# Altium PCB SOM_PCB_BLUETECHNIX.PcbDoc (part 7 of 8)
Units mil, origin at the board's own origin, x right, y up, seen from the top; angles counter-clockwise.
Board outline 1225 x 1620 mil, 8 copper layers (Top Layer, Int1 (Sign), Int2 (GND), Int3 (Sign), Int4 (Sign), Int5 (PWR), Int6 (Sign), Bottom Layer), stack 66.2 mil thick; 65 components, 201 nets, 938 pads, 497 vias.
Unrouted connection lines stored in the file: 25.
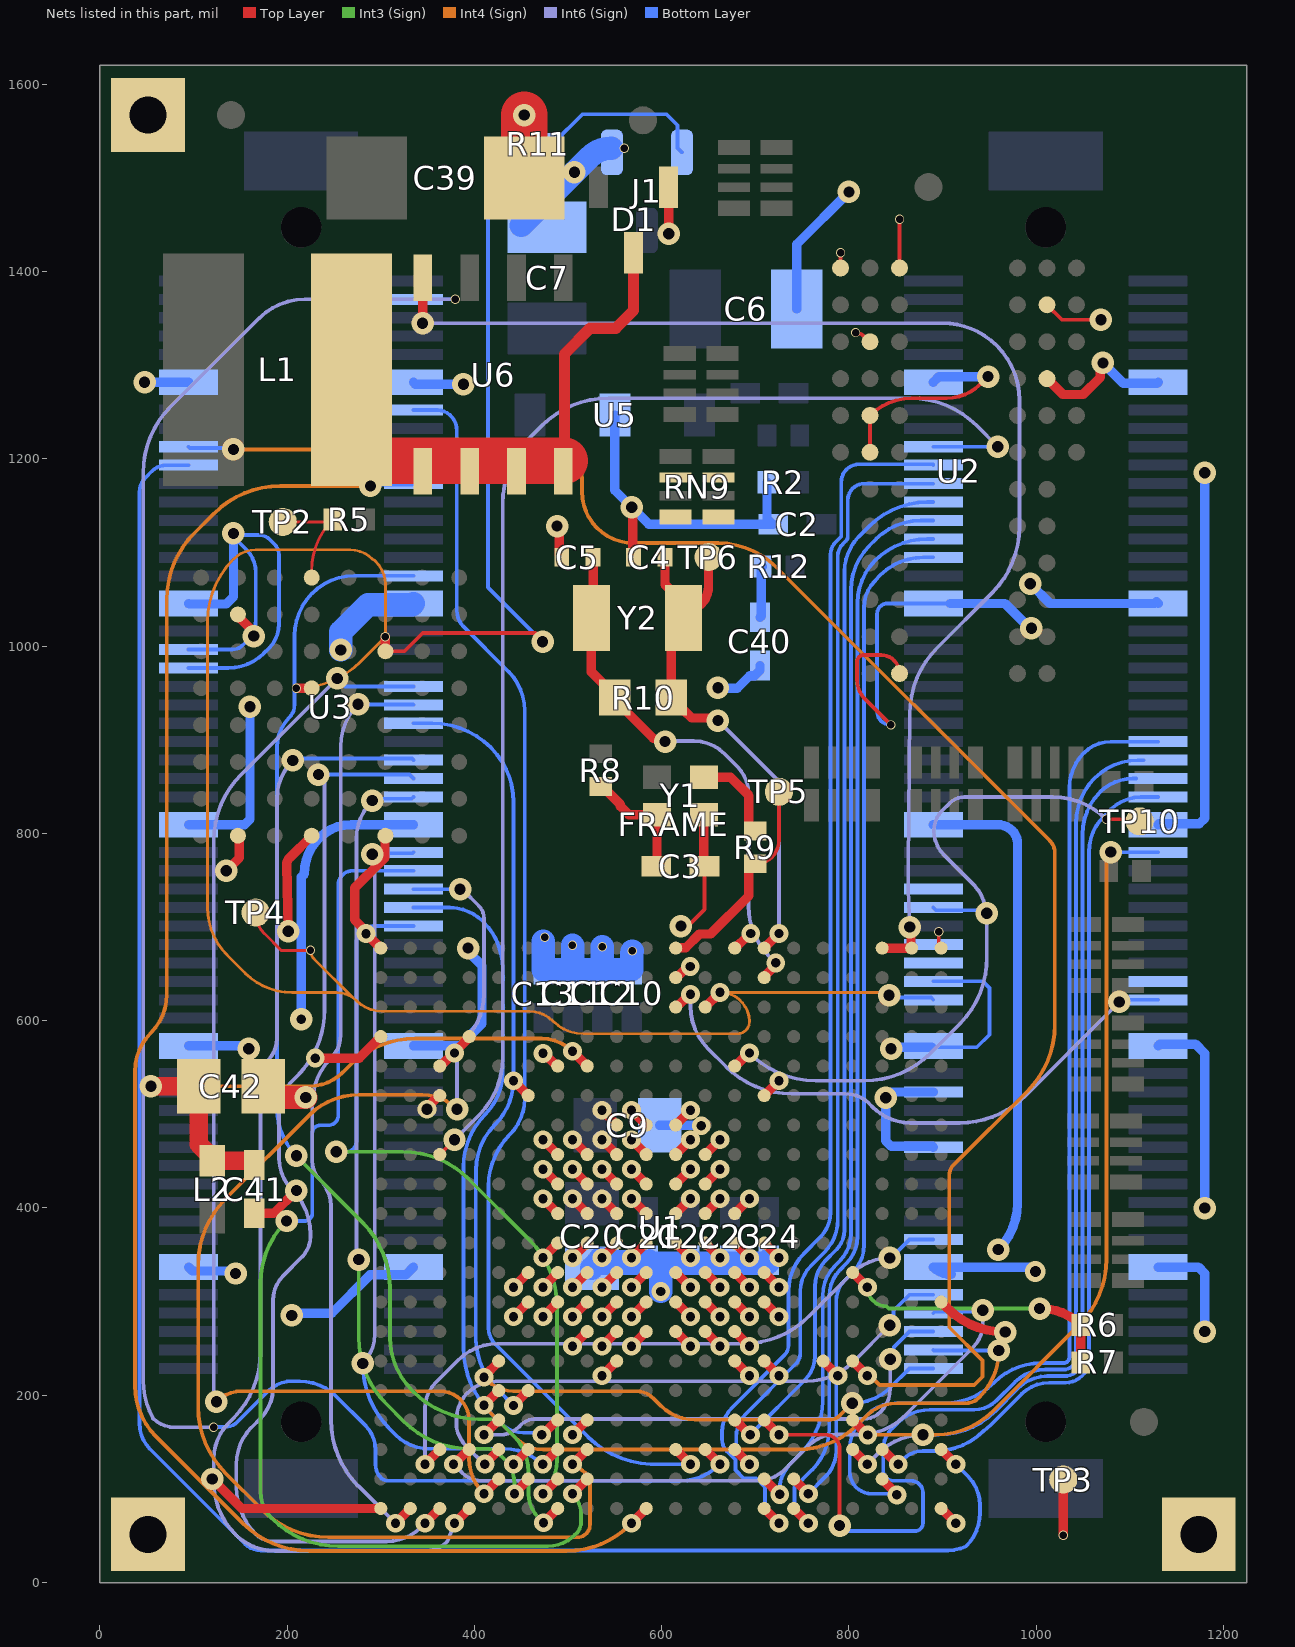
[diagram p12: the nets of this part, all layers, seen from the top]

## Via types
v1: diameter 20, hole 10, Top Layer to Int2 (GND), tented both sides, 68 vias
v2: diameter 10, hole 8, Top Layer to Int3 (Sign), tented both sides, 53 vias
v3: diameter 20, hole 10, Top Layer to Bottom Layer, tented both sides, 44 vias
v4: diameter 10, hole 8, Top Layer to Int1 (Sign), tented both sides, 41 vias
v5: diameter 20, hole 10, Top Layer to Int5 (PWR), tented both sides, 40 vias
v6: diameter 10, hole 8, Top Layer to Int4 (Sign), tented both sides, 33 vias
v7: diameter 20, hole 10, Top Layer to Int3 (Sign), tented both sides, 25 vias
v8: diameter 24, hole 12, Int6 (Sign) to Bottom Layer, tented both sides, 22 vias
v9: diameter 20, hole 10, Top Layer to Int4 (Sign), tented both sides, 19 vias
v10: diameter 24, hole 12, Int4 (Sign) to Bottom Layer, tented both sides, 17 vias
v11: diameter 24, hole 12, Int2 (GND) to Bottom Layer, tented both sides, 15 vias
v12: diameter 20, hole 10, Top Layer to Int1 (Sign), tented both sides, 13 vias
v13: diameter 24, hole 12, Top Layer to Int6 (Sign), tented both sides, 11 vias
v14: diameter 24, hole 12, Top Layer to Int4 (Sign), tented both sides, 10 vias
v15: diameter 24, hole 12, Top Layer to Int3 (Sign), tented both sides, 8 vias
v16: diameter 11, hole 8, Top Layer to Int1 (Sign), tented both sides, 8 vias
v17: diameter 10, hole 8, Top Layer to Bottom Layer, tented both sides, 7 vias
v18: diameter 20, hole 10, Top Layer to Int6 (Sign), tented both sides, 7 vias
v19: diameter 10, hole 8, Top Layer to Int6 (Sign), tented both sides, 6 vias
v20: diameter 10, hole 8, Int4 (Sign) to Bottom Layer, tented both sides, 6 vias
v21: diameter 24, hole 12, Int1 (Sign) to Bottom Layer, tented both sides, 5 vias
v22: diameter 24, hole 12, Top Layer to Int2 (GND), tented both sides, 5 vias
v23: diameter 10, hole 7, Top Layer to Int1 (Sign), tented both sides, 4 vias
v24: diameter 10, hole 8, Top Layer to Int2 (GND), tented both sides, 4 vias
v25: diameter 10, hole 8, Int2 (GND) to Bottom Layer, tented both sides, 4 vias
v26: diameter 24, hole 12, Int3 (Sign) to Bottom Layer, tented both sides, 4 vias
v27: diameter 24, hole 12, Top Layer to Bottom Layer, tented both sides, 4 vias
v28: diameter 10, hole 8, Int5 (PWR) to Bottom Layer, tented both sides, 3 vias
v29: diameter 20, hole 10, Int2 (GND) to Bottom Layer, tented both sides, 2 vias
v30: diameter 10, hole 8, Int6 (Sign) to Bottom Layer, tented both sides, 2 vias
v31: diameter 10, hole 8, Top Layer to Bottom Layer, 1 vias
v32: diameter 22, hole 12, Int2 (GND) to Bottom Layer, tented both sides, 1 vias
v33: diameter 24, hole 10, Int2 (GND) to Bottom Layer, tented both sides, 1 vias
v34: diameter 20, hole 12, Top Layer to Int5 (PWR), tented both sides, 1 vias
v35: diameter 20, hole 12, Top Layer to Int2 (GND), tented both sides, 1 vias
v36: diameter 24, hole 12, Top Layer to Int5 (PWR), tented both sides, 1 vias
v37: diameter 24, hole 12, Top Layer to Int1 (Sign), tented both sides, 1 vias

## Nets (pads, with @x,y where several pads share a name; then routed paths per layer and width w, separated by ;. In a path a pad name is that pad's centre, name@x,y a point inside that pad or via, vN(x,y) a via of type N, cw(c..) or ccw(c..) an arc to the next point about the centre after c; other vN are vias at no path point) (continued)
GND: C2.1 C3.1 C4.1 C5.1 C6.2 C7.2 C9.1 C10.1 C11.1 C12.1 C13.1 C20.1 C21.1 C22.1 C23.1 C24.1 C39.2 C40.1 C41.1 C42.1 D1.3 FRAME.61 FRAME.64 FRAME.68 FRAME.183 FRAME.184 FRAME.201 FRAME.202 FRAME.203 FRAME.204 FRAME.205 FRAME.206 FRAME.207 FRAME.208 FRAME.209 FRAME.210 FRAME.213 FRAME.214 FRAME.215 FRAME.216 FRAME.217 FRAME.218 FRAME.219 FRAME.220 FRAME.221 FRAME.222 FRAME.H5 FRAME.H6 J1.1 R2.1 TP3.0 U1.A1 U1.A13 U1.A20 U1.B11 U1.D1 U1.D4 U1.E3 U1.E7 U1.F3 U1.F6 U1.F14 U1.G9 U1.G10 U1.G11 U1.H7 U1.H8 U1.H9 U1.H10 U1.H11 U1.H12 U1.J7 U1.J8 U1.J9 U1.J10 U1.J11 U1.J12 U1.K7 U1.K8 U1.K9 U1.K10 U1.K11 U1.K12 U1.K13 U1.L7 U1.L8 U1.L9 U1.L10 U1.L11 U1.L12 U1.L13 U1.L14 U1.M6 U1.M7 U1.M8 U1.M9 U1.M10 U1.M11 U1.M12 U1.M13 U1.M14 U1.N6 U1.N7 U1.N8 U1.N9 U1.N10 U1.N11 U1.N12 U1.N13 U1.N14 U1.N20 U1.P8 U1.P9 U1.P10 U1.P11 U1.P12 U1.P13 U1.R9 U1.R13 U1.R14 U1.R16 U1.U8 U1.V6 U1.Y1 U1.Y20 U2.A1 U2.A3 U2.B8 U2.C2 U2.D8 U2.E2 U2.F2 U2.M3 U3.B2 U3.H2 U3.H4 U3.H6 U5.2 Y1.2 | length 8551.9
  Top Layer w4: v22(620.54,701.03) 622.59,698.98 625.9,698.98 645.76,718.85 C3.1@645.76,765 ; U2.A1@791.02,1403.74 v24(791.02,1420) ; v24(807.01,1334.84) cw(c807.01,1323.7) 814.87,1331.58 ; 814.88,1331.58 820.67,1325.79 823.3,1325.79 U2.C2@822.52,1325 ; U2.F2@822.52,1206.89 U2.E2@822.52,1246.26 cw(c867.12,1201.66) 867.12,1264.73 904.17,1264.73 ccw(c904.17,1316.09) 940.49,1279.78 v27(948.5,1287.79) ; v6(844.83,915.74) 817.15,943.42 cw(c838,964.26) 808.52,964.26 808.52,982.82 cw(c816.14,982.82) 816.14,990.44 834.25,990.44 cw(c834.25,970.67) U2.M3@854.02,970.67 ; U2.A3@854.02,1403.74 v24(854.02,1455.82) ; v24(895.85,694.93) 895.85,680.1 ccw(c898.46,680.1) U1.A20@898.46,677.48 ; U2.B8@1011.5,1364.37 1027.39,1348.48 v22(1069.07,1348.48)
  Top Layer w10: v15(120,110.55) 151.5,79.06 U1.Y1@300.04,79.06 ; v15(135,760) 148.82,773.82 148.82,796.22 U3.H2@147.52,797.52 ; U3.B2@147.52,1033.74 147.52,1031.85 162,1017.37 162,1013.12 v22(164.46,1010.66) ; C41.1@165,394.24 185.72,394.24 v15(210,418.51) ; v15(201.28,695.55) 199.59,766.47 cw(c209.59,766.71) 202.45,773.71 ; 202.48,773.74 U3.H4@226.26,797.52 ; v1(230,560) 277.05,560 U1.D1@300.04,582.99 ; U1.A1@300.04,677.48 299.86,677.48 284.38,692.96 284.38,695.49 272.13,707.74 272.13,741.62 304.52,774.02 304.52,797.04 U3.H6@305,797.52 ; v35(349.4,505.39) 349.4,507.29 362.11,520 U1.F3@363.03,520 ; U1.E3@363.03,551.5 363.9,551.5 377.91,565.5 v1(378.78,565.5) 378.78,566.37 394.53,582.12 U1.D4@394.53,582.99 ; v1(441.77,126.3) U1.V6@457.52,142.05 ; v1(441.77,283.78) U1.N6@457.52,299.53 ; v1(441.77,315.28) U1.M6@457.52,331.02 ; v1(441.77,535.75) U1.F6@457.52,520 ; v1(473.27,283.78) U1.N7@489.02,299.53 ; v1(473.27,315.28) U1.M7@489.02,331.02 ; v1(473.27,346.77) U1.L7@489.02,362.52 ; v1(473.27,409.76) U1.K7@489.02,394.02 ; v1(473.27,441.26) U1.J7@489.02,425.51 ; v1(473.27,472.76) U1.H7@489.02,457.01 ; v1(473.27,565) 474.43,565 487.93,551.5 U1.E7@489.02,551.5 ; v15(488.31,1128.19) 490.78,1125.73 490.78,1097.46 C5.1@493.24,1095 ; v1(504.76,157.8) U1.U8@520.51,173.54 ; v1(504.76,252.28) U1.P8@520.51,268.03 ; v1(504.76,283.78) U1.N8@520.51,299.53 ; v1(504.76,315.28) U1.M8@520.51,331.02 ; v1(504.76,346.77) U1.L8@520.51,362.52 ; v1(504.76,409.76) U1.K8@520.51,394.02 ; v1(504.76,441.26) U1.J8@520.51,425.51 ; v1(504.76,472.76) U1.H8@520.51,457.01 ; v1(536.26,220.79) U1.R9@552.01,236.54 ; v1(536.26,252.28) U1.P9@552.01,268.03 ; v1(536.26,283.78) U1.N9@552.01,299.53 ; v1(536.26,315.28) U1.M9@552.01,331.02 ; v1(536.26,346.77) U1.L9@552.01,362.52 ; v1(536.26,409.76) U1.K9@552.01,394.02 ; v1(536.26,441.26) U1.J9@552.01,425.51 ; v1(536.26,472.76) U1.H9@552.01,457.01 ; v1(536.26,504.25) U1.G9@552.01,488.5 ; v1(567.76,252.28) U1.P10@583.5,268.03 ; v1(567.76,283.78) U1.N10@583.5,299.53 ; v1(567.76,315.28) U1.M10@583.5,331.02 ; v1(567.76,346.77) U1.L10@583.5,362.52 ; v1(567.76,409.76) U1.K10@583.5,394.02 ; v1(567.76,441.26) U1.J10@583.5,425.51 ; v1(567.76,472.76) U1.H10@583.5,457.01 ; v1(567.76,504.25) U1.G10@583.5,488.5 ; v14(568,1148.17) 569,1147.17 569,1096 C4.1@570,1095 ; D1.3@607.4,1490 607.4,1440.3 v15(607.5,1440.2) ; U1.P11@615,268.03 v1(630.75,252.28) ; U1.N11@615,299.53 v1(630.75,283.78) ; U1.M11@615,331.02 v1@624.35,321.68 ; U1.L11@615,362.52 v1(630.75,346.77) ; U1.K11@615,394.02 v1(630.75,409.76) ; U1.J11@615,425.51 v1(630.75,441.26) ; U1.H11@615,457.01 v1(630.75,472.76) ; U1.G11@615,488.5 v1(630.75,504.25) ; U1.B11@615,645.98 616.08,645.98 625.18,655.09 v1(630.39,657.84) ; Y1.2@645,820 645,765.76 C3.1@645.76,765 ; U1.P12@646.5,268.03 v1(662.24,252.28) ; U1.N12@646.5,299.53 v1(662.24,283.78) ; U1.M12@646.5,331.02 v1@660.7,316.82 ; U1.L12@646.5,362.52 v1(662.24,346.77) ; U1.K12@646.5,394.02 v1(662.24,409.76) ; U1.J12@646.5,425.51 v1(662.24,441.26) ; U1.H12@646.5,457.01 v1(662.24,472.76) ; U1.R13@677.99,236.54 v1(693.74,220.79) ; U1.P13@677.99,268.03 v1(693.74,252.28) ; U1.N13@677.99,299.53 v1(693.74,283.78) ; U1.M13@677.99,331.02 v1(693.74,315.28) ; U1.L13@677.99,362.52 v1(693.74,346.77) ; U1.K13@677.99,394.02 v1(693.74,409.76) ; U1.A13@677.99,677.48 678.62,677.48 691.84,690.7 v1@691.84,696.28 ; U1.R14@709.49,236.54 v1(725.24,220.79) ; U1.N14@709.49,299.53 v1(725.24,283.78) ; U1.M14@709.49,331.02 v1(725.24,315.28) ; U1.L14@709.49,362.52 v1(725.24,346.77) ; U1.F14@709.49,520 v1(725.24,535.75) ; U1.R16@772.48,236.54 v1(788.23,220.79) ; U1.Y20@898.46,79.06 v3(914.21,63.31) ; U1.N20@898.46,299.53 904.77,293.23 ccw(c966.99,355.44) 904.92,293.07 ccw(c966.99,355.44) v22(966.99,267.45) ; U2.D8@1011.5,1285.63 1028.5,1268.63 1050.03,1268.63 1068.54,1287.14 1068.54,1299.71 v27(1071.22,1302.38) ; v31(1028.87,50.41) TP3.0@1028.87,109.93
  Top Layer w25: C42.1@174.41,530 174.41,528.68 185.14,517.95 v15(220,517.95)
  Top Layer w50: C39.2@453.23,1500 v22(453.23,1567)
  Bottom Layer w4: FRAME.183@94.84,976.61 137.13,976.61 ccw(c137.13,1030.81) 175.43,992.46 ; FRAME.184@94.84,996.3 141.52,996.3 ccw(c141.52,1012.16) 152.73,1000.94 157.38,1005.59 ccw(c134.95,1028.01) 166.66,1028.01 166.66,1078.67 ccw(c132.52,1078.67) 156.69,1102.79 ; 156.66,1102.82 142.74,1116.73 144.67,1118.66 169.4,1118.66 cw(c169.4,1101.14) 181.77,1113.54 ; 175.45,992.49 180.58,997.62 ; 180.6,997.63 ccw(c154.65,1023.55) 191.32,1023.55 191.32,1097.25 ccw(c175.05,1097.25) 186.57,1108.75 181.79,1113.53 ; v6(844.83,915.74) cw(c844.83,930.57) 830,930.57 830,1034.24 cw(c841.27,1034.24) 841.27,1045.51 FRAME.209@890.12,1045.51 FRAME.209@908,1045.51 ; FRAME.207@888.58,571.54 936.54,571.54 950,585 950,635 943.03,641.97 FRAME.68@890.12,641.97
  Bottom Layer w10: v11(47.87,1281.73) FRAME.218@94.84,1281.73 ; FRAME.222@94.84,336.85 99.01,332.68 142.32,332.68 v21(145,330) ; FRAME.221@94.84,573.07 156.1,573.07 v11(159.17,570) ; FRAME.220@94.84,809.29 154.5,809.29 160.36,815.15 v11(160.36,935.32) ; FRAME.219@94.84,1045.51 95.35,1045 135,1045 142.74,1052.74 v11@142.74,1116.73 ; v21(205,285.23) 205.59,285.23 208,287.64 247.62,287.64 288.5,328.52 326.67,328.52 FRAME.217@335,336.85 ; v33(215.15,601.47) 215.15,753.36 218.49,756.7 cw(c272.93,756.7) 234.44,795.2 cw(c268.47,761.16) 268.47,809.29 FRAME.215@335,809.29 ; FRAME.216@335,573.07 384.4,573.07 408.15,596.82 408.15,658.81 393.28,673.69 v11(393.28,677.48) ; FRAME.213@335,1281.73 337.03,1279.7 v21(388.28,1279.7) ; U5.2@550,1246.7 550,1166.34 586.34,1130 C2.1@718.32,1130 ; C9.1@597.71,488.2 641.8,488.2 v29(642.2,487.8) ; v21(660.11,955.45) 660.57,955 680.76,955 694.08,968.31 699.16,968.31 705,974.16 C40.1@705,979.24 ; R2.1@712.48,1175 712.48,1135.84 C2.1@718.32,1130 ; C2.1@719.24,1130 C2.1@718.32,1130 ; C6.2@744.13,1360 744.13,1429.13 v11(800,1485) ; v11@839.31,517.74 839.92,517.74 846.04,523.86 FRAME.64@890.12,523.86 ; v11(839.35,517.8) 839.31,516.79 839.31,471.57 845.16,465.71 889.21,465.71 FRAME.61@890.12,464.8 ; v11(845,570) 846.54,571.54 FRAME.207@888.58,571.54 ; FRAME.208@890.12,809.29 958.82,809.29 cw(c958.82,787.25) 974.41,802.83 cw(c960.91,789.34) 980,789.34 980,404.99 cw(c910.05,404.99) v11(959.51,355.53) ; FRAME.210@890.12,1281.73 896.17,1287.79 v27(948.5,1287.79) ; FRAME.209@908,1045.51 966.52,1045.51 v11@994.82,1017.21 ; FRAME.206@909.07,329 cw(c909.07,355.8) FRAME.206@890.12,336.85 990.34,336.85 cw(c990.34,332.19) v32@995,332.19 ; v11(993.68,1066.49) 1014.66,1045.51 1126.6,1045.51 1128.44,1047.35 FRAME.202@1130.28,1045.51 ; v32@995.02,332.17 v32(999.14,332.17) ; v27(1071.22,1302.38) 1093.11,1280.5 1129.04,1280.5 FRAME.201@1130.28,1281.73 ; FRAME.205@1130.28,336.85 1173.15,336.85 1180,330 v11(1180,267.95) ; FRAME.204@1130.28,573.07 1132.16,574.96 1170,574.96 1180,564.96 v11(1180,399.84) ; FRAME.203@1130.28,809.29 1131.13,810.15 1174.14,810.15 1180,816 v11(1180,1185)
  Bottom Layer w25: v11(257.26,995.83) 257.26,1015.09 286.4,1044.23 333.72,1044.23 FRAME.214@335,1045.51 ; C7.2@450,1449.13 v21(506.9,1506) ; v25@473.74,684.58 C13.1@473.74,654.37 567.12,654.37 ccw(c567.12,655.71) C10.1@568.06,654.76 568.06,669.68 cw(c593.07,669.68) v25(568.52,674.41) ; v25(504.76,680.48) 505.07,680.17 C11.1@505.07,654.76 ; v21(506.9,1506) 522.93,1522.04 cw(c546.34,1498.62) J1.1@546.34,1531.73 ; C20.1@525.46,335.59 530.69,340.81 603.66,340.81 ; C20.1@534.39,345.72 ccw(c542.58,353.97) 542.58,342.34 585.6,342.34 C21.1@585.6,343.43 ; C12.1@536.57,654.76 v25(536.57,679) ; v29(598.89,310.78) 598.89,327.48 cw(c619.9,327.48) 603.66,340.81 ; C24.1@714.44,344.24 714.44,342.47 712.78,340.81 603.66,340.81
  other v1: 630.75,315.28 662.24,315.28 284.2,692.96 695.11,693.01
  other v10: 568,1148.17
  other v11: 994.82,1019.11 142.74,1120.31
  other v17: 560.09,1531.73
  other v20: 844.83,915.74
  other v25: 475.02,688.87
JTAG_E\M\U\: FRAME.51 U1.R5 | length 536.9
  Top Layer w10: v9(410.28,219.34) 410.28,220.06 426.02,235.81 U1.R5@426.02,236.54
  Int4 (Sign) w4: v9(410.28,219.34) 413.63,215.99 ccw(c441.77,244.17) 441.77,204.34 572.65,204.34 cw(c572.65,178.1) 591.19,196.67 598.89,188.97 ccw(c635.55,225.63) 635.37,173.79 ccw(c635.55,225.63) 635.55,173.79 778.43,173.55 ccw(c778.43,190.51) 790.41,178.51 v10(803.44,191.5)
  Bottom Layer w4: v10(803.44,191.5) ccw(c803.4,249.56) 841.54,205.79 ccw(c803.4,249.56) 844.45,208.51 864.53,228.58 FRAME.51@890.12,228.58
JTAG_T\R\S\T\: FRAME.52 U1.T5 | length 781.6
  Top Layer w10: v9(410.28,189.29) U1.T5@426.02,205.04
  Int4 (Sign) w4: v9(410.28,189.29) 410.28,188.22 444.36,154.13 ccw(c473.83,183.59) 473.83,141.92 745.2,141.92 ccw(c745.2,232.32) 809.09,168.38 818.47,177.76 cw(c851.66,144.57) 851.66,191.5 924.68,191.5 ccw(c924.68,211.4) 938.75,197.33 939.37,197.95 ccw(c889.55,247.76) 944.8,204.05 ccw(c889.55,247.76) v10(960,247.76)
  Bottom Layer w4: FRAME.52@890.12,248.27 FRAME.52@890.37,248.01 ; v10@960,247.26 959.49,247.76 890.62,247.76 FRAME.52@890.37,248.01 ; v10(960,247.76) 959.75,248.01 FRAME.52@890.37,248.01
JTAG_TCK: FRAME.56 U1.V3 | length 697.9
  Top Layer w10: v3(347.28,126.3) U1.V3@363.03,142.05
  Int6 (Sign) w4: v3(347.28,126.3) 347.28,185.93 cw(c386,185.93) 358.62,213.31 383.18,237.86 cw(c424.55,196.49) 424.55,255 686.53,255 ccw(c686.53,355) 757.24,284.29 802.58,329.63 cw(c843.62,288.59) v8(843.62,346.63)
  Bottom Layer w4: v8(843.62,346.63) 844.78,346.63 864.53,366.38 FRAME.56@890.12,366.38
JTAG_TDI: FRAME.55 U1.V5 | length 655.5
  Top Layer w10: v18(411.25,126.44) 411.25,126.86 426.02,141.63 U1.V5@426.02,142.05
  Int6 (Sign) w4: 392.68,202.47 ccw(c421.37,173.82) 380.83,173.82 380.83,166.03 ccw(c420.75,173.18) 392.07,144.51 410.13,126.44 v18(411.25,126.44) ; 392.7,202.49 cw(c422.9,172.29) 422.9,215 754.6,215 ccw(c754.6,285.91) 804.74,235.77 v8(843.62,274.65)
  Bottom Layer w4: v8(843.62,274.65) 847.45,278.48 847.45,290.24 864.53,307.32 FRAME.55@890.12,307.32
JTAG_TDO: FRAME.54 U1.V4 | length 733.4
  Top Layer w10: v3(377.76,126.3) 378.27,126.3 394.02,142.05 U1.V4@394.53,142.05
  Int6 (Sign) w4: v3(377.76,126.3) 386.64,117.42 ccw(c408.06,138.85) 408.06,108.55 701.68,108.55 ccw(c701.68,150.89) 701.77,108.55 ccw(c701.68,150.89) 731.6,120.93 756.73,146.06 cw(c785.81,116.99) 785.81,158.11 812.65,158.11 ccw(c812.65,222.91) 858.48,177.09 932.69,251.3 ccw(c907.8,276.19) 943,276.19 v8(943,290.77)
  Bottom Layer w4: FRAME.54@890.12,287.64 891.68,289.2 941.44,289.2 v8(943,290.77)
JTAG_TMS: FRAME.53 U1.U5 | length 575.1
  Top Layer w10: v3(410.28,157.8) U1.U5@426.02,173.54
  Int6 (Sign) w4: v3(410.28,157.8) 427.35,157.8 ccw(c427.35,186.32) 447.49,166.13 449.9,168.53 cw(c464.32,154.11) 464.32,174.5 815.22,174.5 ccw(c815.22,200.47) 833.58,182.11 ccw(c808.06,207.63) 844.15,207.63 v8(844.15,238.43)
  Bottom Layer w4: v8(844.15,238.43) 847.97,242.25 847.97,251.4 864.53,267.95 FRAME.53@890.12,267.95
N\M\I\: FRAME.34 U1.C11 | length 639.7
  Top Layer w10: U1.C11@615,614.49 616.08,614.49 629.59,628 v3(630.75,628)
  Int6 (Sign) w4: v3(630.75,628) 630.75,615.5 ccw(c695.1,615.5) 649.6,570 668.37,551.23 ccw(c739.08,621.94) 739.08,521.94 796.08,521.94 cw(c796.08,485.76) 821.67,511.34 825.63,507.38 ccw(c865.6,547.35) 833.61,500.74 ccw(c865.6,547.35) 865.6,490.82 918.05,490.82 ccw(c918.05,590.82) 961.47,500.74 ccw(c918.05,590.82) 988.76,520.11 v8(1088.64,620)
  Bottom Layer w4: v8(1088.64,620) 1090.93,622.28 FRAME.34@1130.28,622.28
NetC3_2: C3.2 R8.2 Y1.1 | length 128.7
  Top Layer w10: R8.2@535,849.96 536.77,849.96 555.95,830.78 555.95,829.05 565,820 Y1.1@595,820 595,765.76 C3.2@594.24,765
NetC4_2: C4.2 R10.1 TP6.0 U1.A14 Y2.1 | length 574.8
  Top Layer w10: C4.2@603.53,1095 603.53,1065.65 623.43,1045.75 Y2.1@623.43,1037.17 ; TP6.0@650,1095 650,1063.74 cw(c623.43,1063.74) Y2.1@623.43,1037.17 ; v13(660.11,920.48) 657.43,923.16 632.08,923.16 624.53,930.71 622.17,930.71 610.24,942.64 R10.1@610.24,945 610.24,1016.81 Y2.1@623.43,1030 Y2.1@623.43,1037.17 ; U1.A14@709.49,677.48 709.6,677.48 725.12,693 v18(725.24,693)
  Int6 (Sign) w4: v13(660.11,920.48) 725.24,855.35 v18(725.24,693)
NetC5_2: C5.2 R10.2 U1.B14 Y2.2 | length 550.6
  Top Layer w10: C5.2@526.76,1095 526.76,1031.76 Y2.2@525,1030 525,972.36 550,947.36 R10.2@550,945 550,942.64 591.07,901.57 ; U1.B14@709.49,645.98 709.49,647.07 721.73,659.31 v18(721.73,661.67)
  Int6 (Sign) w4: v13(603.61,898) 604.21,898.61 634.35,898.61 cw(c634.35,852.15) 667.2,885 680.47,871.73 ; 680.49,871.71 cw(c650.87,842.13) 692.73,842.13 692.73,722.77 ccw(c770.23,722.77) 715.43,667.97 v18(721.73,661.67)
NetC40_2: C40.2 R12.1 | length 55.3
  Bottom Layer w10: C40.2@705,1030.76 706.24,1032 706.24,1083.76 R12.1@707.48,1085
NetC41_2: C41.2 C42.2 L2.2 U1.E8 | length 676.5
  Top Layer w10: v9(504.76,567.24) U1.E8@520.51,551.5
  Top Layer w20: v14(54.59,530) C42.2@105.59,530 105.59,467.87 120,453.46 L2.2@120,450.51 164.16,450.51 165,449.67 C41.2@165,445.76
  Int4 (Sign) w4: v14(54.59,530) 223.54,530 ccw(c223.54,581.21) 259.74,544.99 266.46,551.71 cw(c337.17,481) 337.17,581 471.55,581 cw(c471.55,534.03) v9@504.74,567.26
NetD1_1: D1.1 L1.1 U6.5 U6.6 U6.7 U6.8 | length 594.2
  Top Layer w12: U6.8@495,1186.75 496.13,1187.88 496.13,1197.83 496.16,1311.97 523.72,1339.52 551.18,1339.52 570,1358.34 D1.1@570,1420
  Top Layer w50: L1.1@268.74,1295 268.74,1216.14 287.05,1197.83 345,1197.83 395,1197.83 445,1197.83 U6.8@496.13,1197.83
NetJ1_2: J1.2 R11.1 | length 182.1
  Bottom Layer w4: R11.1@485.04,1535.89 485.04,1537.66 515.37,1567.99 605.16,1567.99 616.99,1556.16 616.99,1531.95 J1.2@621.7,1527.23
NetR5_1: R5.1 TP2.0 U3.A4 | length 122.2
  Top Layer w3: TP2.0@195.39,1132.64 246.38,1132.64 R5.1@248.74,1135 ; U3.A4@226.26,1073.11 226.26,1080.73 cw(c303.01,1080.73) R5.1@248.74,1135 ; R5.1@248.74,1135 R5.1@248.74,1135
NetR6_1: R6.1 R7.1 U1.M17 | length 307.3
  Top Layer w10: U1.M17@803.98,331.02 v3(819.72,315.28) ; v15(1003.6,292.53) 1005.17,292.53 cw(c1005.17,232.68) R6.1@1047.48,275 R7.1@1047.48,235
  Int3 (Sign) w4: v3(819.72,315.28) ccw(c840,315.28) 840,295 842.47,292.53 v15(1003.6,292.53)
NetR9_1: R9.1 Y1.3 | length 98
  Top Layer w10: Y1.3@645,860 673.49,860 693.19,840.3 693.19,807.56 698.23,802.52 R9.1@700,802.52
NetR9_2: R9.2 TP5.0 U1.A11 | length 230.6
  Top Layer w4: R9.2@700,767.48 ccw(c700,792.72) 725.24,792.72 TP5.0@725.24,844.43
  Top Layer w10: U1.A11@615,677.48 615.41,677.9 625.7,677.9 640.28,692.48 652.24,692.48 693.19,733.43 693.19,762.44 698.23,767.48 R9.2@700,767.48
NetRN9_2: RN9.2
NetRN9_4: RN9.4
NetRN9_5: RN9.5
NetRN9_7: RN9.7
NetU1_A18: U1.A18 U1.A19 U6.4 | length 1389.8
  Top Layer w10: v13(344.65,1344.72) 344.82,1344.9 344.82,1393.07 U6.4@345,1393.25 ; U1.A18@835.47,677.48 865,677.48 U1.A19@866.31,677.48 ; v13(864.83,699.87) 866.2,698.5 866.2,678.25 U1.A19@866.97,677.48
  Int6 (Sign) w4: v13(344.65,1344.72) 900.42,1344.72 cw(c900.42,1263.54) 922.79,1341.58 cw(c900.42,1263.54) 957.8,1320.97 cw(c899.26,1262.39) 982.08,1262.39 982.08,1127.34 cw(c882.08,1127.34) 952.79,1056.63 894.29,998.13 ccw(c965,927.42) 865,927.42 863.3,765.15 863.3,765 863.3,740.73 ccw(c892.42,740.73) 863.32,739.62 v13(864.83,699.87)
NetU4_33: FRAME.33
NetU4_69: FRAME.69
NetU4_70: FRAME.70
NetU4_73: FRAME.73
PB2: FRAME.121 U1.T6 | length 845
  Top Layer w10: v3(441.77,189.1) 441.77,189.2 457.52,204.94 U1.T6@457.52,205.04
  Bottom Layer w4: FRAME.121@335,917.56 354.77,917.56 cw(c354.77,828.5) 417.74,891.47 cw(c359.72,833.45) 441.77,833.45 441.77,543.54 441.77,536.79 cw(c374.28,536.79) 434.35,506.02 cw(c374.28,536.79) 422,489.07 ccw(c471.12,439.95) 401.66,439.95 401.66,423.09 ccw(c538.95,416.88) 401.52,416.88 ; 401.52,416.84 401.52,259.81 ccw(c480.28,262.02) 424.56,206.31 v3(441.77,189.1)
RESET: FRAME.67 R11.2 TP4.0 U1.C12 U3.C6 U3.D4 | length 2623.1
  Top Layer w3: TP4.0@166.46,715.43 ccw(c198.05,715.43) 175.71,693.09 193.8,675 v6(225,675)
  Top Layer w4: U3.C6@305,994.37 325.28,994.37 344.91,1014 463.27,1014 cw(c463.27,1004.5) v14(472.77,1004.5)
  Top Layer w10: v6(210,955) U3.D4@226.26,955 ; U3.C6@305,994.37 v6(305,1010) ; U1.C12@646.5,614.49 v9(662.24,630.16)
  Int4 (Sign) w3: v6(210,955) ccw(c210,1051.57) 278.28,983.28 v6(305,1010) 305,1065.86 ccw(c270.86,1065.86) 295,1090 ccw(c282.93,1077.93) 291.29,1092.81 ccw(c267.14,1068.67) 267.14,1102.82 166.89,1102.82 ccw(c166.89,1068.67) 142.74,1092.82 ccw(c209.72,1025.84) 115,1025.84 115,720.7 ccw(c186.7,720.7) 136,670 155.23,650.77 ccw(c205.38,700.92) 205.38,630 253.09,630 cw(c253.09,600.44) 270.17,624.57 ; v6(225,675) ccw(c237.7,675) 228.72,666.02 270.17,624.57 ; v9(662.24,630.16) 835.51,630.16 cw(c835.51,619.71) v10(842.9,627.1) ; v9@663.05,630.15 cw(c662.45,598.87) 693.73,599.47 cw(c662.45,598.87) 693.74,598.87 cw(c680.87,598.87) 680.87,586 516.41,586 cw(c516.41,631.66) 484.13,599.37 ccw(c458.47,573.72) 458.47,610 301.38,610 cw(c301.38,648.72) 274,621.34 ccw(c253.09,600.44) 270.17,624.57
  Bottom Layer w4: 422.38,1524.86 ccw(c441.24,1506) 414.57,1506 414.57,1062.7 v14(472.77,1004.5) ; 422.46,1524.94 cw(c448.97,1498.31) 440.86,1535 cw(c448.97,1498.31) 448.97,1535.89 R11.2@450,1535.89 ; v10(842.9,627.1) 845.31,624.69 887.71,624.69 FRAME.67@890.12,622.28
  other v10: 472.77,1004.5
RSCLK0: FRAME.93 U1.H3 | length 1396.3
  Top Layer w4: U1.H3@363.03,457.01 v13(378.78,472.76)
  Int6 (Sign) w4: v13(378.78,472.76) 404.49,498.47 ; 404.52,498.5 ccw(c342.42,560.54) 430.2,560.54 430.2,1151.98 cw(c530.2,1151.98) 459.49,1222.69 472.24,1235.44 cw(c542.96,1164.73) 542.96,1264.73 865.68,1264.73 cw(c865.68,1164.73) 936.39,1235.44 v8(959,1212.83)
  Bottom Layer w4: FRAME.93@890.12,1212.83 v8(959,1212.83)
SCL1: FRAME.119 U1.W5 | length 1304.4
  Top Layer w10: v9(410.28,94.8) U1.W5@426.02,110.55
  Int4 (Sign) w4: v10(124.54,193.15) cw(c151.56,166.13) 151.56,204.34 363.28,204.34 cw(c363.28,173.35) 394.27,173.35 394.27,132.82 ccw(c448.04,132.82) v9@409.99,94.83 ; v9@410.02,94.8 v9(410.28,94.8)
  Int6 (Sign) w4: v10@126.34,193.15 cw(c137.41,204.22) 121.76,204.22 121.76,792.11 cw(c221.76,792.11) 151.05,862.82 v8(253.66,965.43)
  Bottom Layer w4: v8(253.66,965.43) 262.17,956.93 FRAME.119@335,956.93
SD_CLK: FRAME.88 U1.Y15 | length 1151.6
  Top Layer w10: U1.Y15@740.98,79.06 v3(756.73,63.31)
  Bottom Layer w4: v3(756.73,63.31) 741.73,78.31 741.73,101.4 760.36,120.03 ccw(c715.38,165.01) 778.99,165.01 778.99,306.04 cw(c818.34,306.04) 790.52,333.86 796.98,340.32 ; 797,340.34 ccw(c767.61,369.68) 809.14,369.68 809.14,1046.1 cw(c873.13,1046.1) 827.86,1091.33 cw(c883.55,1035.69) FRAME.88@883.55,1114.41 ; FRAME.88@883.59,1114.41 FRAME.88@890.12,1114.41
SD_CMD: FRAME.87 U1.W15 | length 1090.1
  Top Layer w10: U1.W15@740.98,110.55 v3(756.73,94.8)
  Bottom Layer w4: v3(756.73,94.8) 775.09,113.17 ccw(c747.71,140.55) 786.44,140.55 786.44,301.08 cw(c816.38,301.08) 795.18,322.23 803.98,331.02 ; 804,331.04 ccw(c774.61,360.39) 816.14,360.39 816.14,1041.37 cw(c856.32,1041.37) 827.6,1069.47 827.74,1069.62 cw(c879.71,1028.39) FRAME.87@879.71,1094.72 ; FRAME.87@879.75,1094.72 FRAME.87@890.12,1094.72
SD_D0: FRAME.92 U1.Y14 | length 1321.6
  Top Layer w10: U1.Y14@709.49,79.06 v3(725.24,63.31)
  Bottom Layer w4: 675.47,187.25 ccw(c701.99,160.77) 664.51,160.77 664.51,153.01 ccw(c683.25,153.01) 670,139.76 678.74,131.02 678.74,120.09 687.53,111.3 700.92,111.3 710.24,101.98 710.24,78.31 v3(725.24,63.31) ; 675.49,187.27 731.2,242.98 ccw(c720.89,253.28) 735.46,253.28 735.46,310.96 cw(c793.38,310.96) 752.43,351.91 769.39,368.88 ccw(c742.92,395.35) 780.35,395.35 780.35,1097.74 cw(c799.7,1097.74) 786.01,1111.41 791.69,1117.09 791.69,1174.95 cw(c810.87,1174.95) 810.87,1194.13 889.13,1194.13 cw(c889.13,1193.15) FRAME.92@890.12,1193.15
SD_D1: FRAME.91 U1.V13 | length 1201.3
  Top Layer w10: U1.V13@677.99,142.05 v3(693.74,126.3)
  Bottom Layer w4: v3(693.74,126.3) 679.61,140.43 679.61,155.13 cw(c715.09,155.13) 690,180.22 743.29,233.51 ; 743.3,233.53 ccw(c731.99,244.8) 747.96,244.8 747.96,310.78 cw(c786.36,310.78) 759.21,337.94 773.46,352.19 ccw(c738.03,387.62) 788.14,387.62 788.14,1096.18 cw(c806.14,1096.18) 793.41,1108.91 796.63,1112.14 ccw(c791.69,1117.09) 798.69,1117.09 798.69,1155.7 cw(c816.45,1155.7) 816.45,1173.46 FRAME.91@890.12,1173.46
SD_D2: FRAME.90 U1.U13 | length 1114.4
  Top Layer w10: U1.U13@677.99,173.54 678.43,173.54 692.46,159.51 v3(694.78,157.77)
  Bottom Layer w4: v3(694.78,157.77) 695.47,158.66 753.29,216.47 ccw(c728.1,241.67) 763.72,241.67 763.72,316.48 cw(c802.52,316.48) 775.08,343.91 786.45,355.27 ; 786.46,355.29 ccw(c765.47,376.26) 795.14,376.26 795.14,1079.14 cw(c848.83,1079.14) 810.85,1117.09 822,1128.24 cw(c883.66,1066.58) 883.66,1153.78 FRAME.90@890.12,1153.78
SD_D3: FRAME.89 U1.W14 | length 1140.9
  Top Layer w10: U1.W14@709.49,110.55 v3(725.96,94.08)
  Bottom Layer w4: v3(725.96,94.08) 725.96,99.02 cw(c765.25,99.02) 737.47,126.8 748.98,138.31 ; 749,138.33 ccw(c693.41,193.88) 771.99,193.88 771.99,306.04 cw(c818.34,306.04) 785.51,338.76 cw(c818.34,306.04) 785.6,338.84 789.8,343.04 ccw(c760.01,372.83) 802.14,372.83 802.14,1059.8 cw(c869.1,1059.8) 821.75,1107.15 828.75,1114.15 ; 828.79,1114.18 cw(c876.91,1065.99) 876.91,1134.09 FRAME.89@890.12,1134.09
SDA1: FRAME.120 U1.Y2 | length 998.8
  Top Layer w10: v3(315.79,63.31) U1.Y2@331.54,79.06
  Int6 (Sign) w4: v8(275.82,937.78) ccw(c320.7,892.9) 257.23,892.9 257.23,584.98 cw(c221.9,584.98) 246.88,560 ccw(c294.89,512) 227,512 227,450.12 ccw(c255.89,450.12) 235.44,429.72 cw(c207.88,402.12) 238.46,426.32 cw(c207.88,402.12) 246.88,402.12 246.88,173.63 ccw(c346.88,173.63) 275.94,103.15 ccw(c346.88,173.63) 276.17,102.92 v3(315.79,63.31)
  Bottom Layer w4: v8(275.82,937.78) 276.09,937.51 334.73,937.51 FRAME.120@335,937.24
TACLK6: FRAME.115 U1.Y7 | length 1271
  Top Layer w10: v7(473.83,63.87) U1.Y7@489.02,79.06
  Int3 (Sign) w4: v26(210,455.79) 210,455.16 280.63,384.53 cw(c209.92,313.82) 309.92,313.82 309.92,261.92 ccw(c389.97,261.92) 333.36,205.32 335.1,203.58 ccw(c405.81,274.29) 404.05,174.31 ccw(c405.81,274.29) 405.81,174.29 414.13,174.29 cw(c414.13,149.98) 431.32,167.17 441.77,156.72 ; 441.8,156.7 cw(c403.03,117.98) 457.82,117.98 457.82,94.88 ccw(c494.03,94.88) 468.42,69.27 v7@473.38,64.32 ; v7@473.38,63.42 v7@473.38,64.32 ; v7(473.83,63.87) v7@473.38,64.32
  Bottom Layer w4: v26(210,455.79) cw(c260.32,506.1) 189.16,506.1 189.16,891.78 cw(c233.97,891.78) 202.28,923.46 ccw(c188.48,937.27) 208,937.27 208,1011.12 cw(c271.91,1011.12) 226.7,1056.3 cw(c271.91,1011.13) 271.91,1075.04 FRAME.115@335,1075.04
TMR0: FRAME.127 U1.W8 | length 1225.2
  Top Layer w10: v7(504.76,94.8) U1.W8@520.51,110.55
  Int3 (Sign) w4: v26(199.39,386.06) ccw(c266.53,318.93) 171.59,318.93 171.59,97.25 ccw(c211.64,97.25) 183.32,68.93 184.19,68.06 ccw(c254.9,138.77) 254.9,38.77 478.48,38.77 ccw(c478.48,79.19) 504.56,48.31 ccw(c478.48,79.19) 507.06,50.61 509.36,52.91 ccw(c498.26,64.01) 513.96,64.01 513.96,72.59 ccw(c482.55,72.59) 512.11,83.23 ccw(c482.55,72.59) v7(504.76,94.8)
  Bottom Layer w4: v26(199.39,386.06) 218.49,386.06 ccw(c218.49,394.57) 227,394.57 227,480.2 cw(c235,480.2) 235,488.2 243.78,488.2 ccw(c243.78,499.17) 254.75,499.17 254.75,744.93 cw(c269.9,744.93) 269.9,760.08 FRAME.127@335,760.08
TMR1: FRAME.128 U1.V8 | length 1423.8
  Top Layer w10: v9(504.76,126.3) U1.V8@520.51,142.05
  Int4 (Sign) w4: 223.43,498.86 134.29,409.72 ccw(c205,339.01) 105,339.01 105,187.45 ccw(c205,187.45) 134.29,116.74 173.43,77.6 ccw(c244.14,148.31) 244.14,48.31 509.94,48.31 ccw(c509.94,61.84) 523.48,61.84 523.48,104.21 ccw(c504.76,104.21) 504.76,122.92 v9(504.76,126.3) ; 223.45,498.89 cw(c276.56,445.74) 276.56,520.87 344.14,520.87 cw(c344.14,468.03) v10(381.5,505.39)
  Int6 (Sign) w4: v10(381.5,505.39) 381.5,555.78 cw(c421.51,555.78) 389.93,580.36 cw(c421.51,555.78) 391.79,582.58 cw(c421.51,555.78) 393.21,584.07 ccw(c345.64,627.83) 406.47,605.97 ccw(c345.64,627.83) 410.28,627.77 ccw(c345.64,627.83) 410.28,627.83 410.28,709.06 ccw(c390.89,709.06) 404.6,722.77 389.04,738.33 ccw(c385,734.29) v8@385,740
  Bottom Layer w4: FRAME.128@335,740.39 335.07,740.32 384.68,740.32 v8(384.75,740.25)
TMR2: FRAME.129 U1.U7 | length 713.6
  Top Layer w10: v3(472.01,157.8) 472.64,157.8 488.39,173.54 U1.U7@489.02,173.54
  Bottom Layer w4: FRAME.129@335,720.71 373.33,720.71 cw(c373.33,669.55) 381.81,720 cw(c373.33,669.55) 409.5,705.72 cw(c359.53,655.75) 430.2,655.75 430.2,544.51 cw(c367.77,544.51) 411.94,500.39 ; 411.92,500.36 ccw(c469.23,443.19) 388.28,443.19 388.28,251.64 ccw(c488.28,251.64) 417.56,180.93 428.5,169.99 ccw(c452.52,194.01) 452.52,160.04 466.58,160.04 cw(c466.58,152.37) v3(472.01,157.8)
TMR3: FRAME.130 U1.W7 | length 857.2
  Top Layer w10: v7(473.27,94.8) U1.W7@489.02,110.55
  Int3 (Sign) w4: v26(252.56,460) 323.33,460 cw(c323.33,360) 394.04,430.71 458.98,365.77 cw(c388.27,295.06) 488.27,295.06 488.27,131.02 cw(c437.05,131.02) v7(473.27,94.8)
  Bottom Layer w4: v26(252.56,460) 263.29,460 ccw(c263.29,470.71) 274,470.71 274,682.67 cw(c292.35,682.67) 292.35,701.02 FRAME.130@335,701.02
TMR4: FRAME.102 U1.V12 | length 2197.8
  Top Layer w10: U1.V12@646.5,142.05 v3(662.24,126.3)
  Int6 (Sign) w4: 79.62,165.8 cw(c79.62,197.89) 56.93,175.2 cw(c131.12,216.08) 46.41,216.08 46.41,1184.99 cw(c146.41,1184.99) 75.7,1255.7 170,1350 cw(c219.04,1300.96) 219.04,1370.31 v30(379.69,1370.31) ; 79.64,165.8 v30(121.45,166)
  Bottom Layer w4: v30(121.45,166) 133.72,166 ccw(c133.72,184.51) 146.79,171.4 179.73,204.34 cw(c205.46,178.61) 205.46,215 213.31,215 cw(c213.31,159.67) 252.43,198.79 283.62,167.61 ; 283.63,167.6 cw(c257.51,141.5) 294.43,141.5 294.43,126.21 ccw(c315.7,126.21) 300.66,111.17 ccw(c309,123.12) 309,108.55 619.39,108.55 ccw(c619.39,169.15) v3(662.24,126.3) ; FRAME.102@335,1370.31 v30(379.69,1370.31)
TMR5: FRAME.106 U1.V11 | length 1352.7
  Top Layer w10: U1.V11@615,142.05 v3(630.75,126.3)
  Bottom Layer w4: FRAME.106@335,1252.2 359.39,1252.2 cw(c359.39,1230.31) 360.63,1252.17 cw(c359.39,1230.31) 381.28,1230.31 381.28,1038.06 ccw(c405.69,1038.06) 388.42,1020.81 ; 388.43,1020.8 436.28,972.95 cw(c394.33,931) 453.66,931 453.66,516.29 cw(c400.33,516.29) 438.04,478.58 ccw(c493.69,422.93) 414.99,422.93 414.99,271.88 ccw(c438.94,271.88) 422,254.94 521.36,155.59 ccw(c592.07,226.3) 588.44,126.37 ccw(c592.07,226.3) 592.07,126.3 v3(630.75,126.3)
TMR6: FRAME.110 U1.Y10 | length 1823.6
  Top Layer w10: v9(567.76,63.31) U1.Y10@583.5,79.06
  Int4 (Sign) w4: v10(288.98,1170.98) 192.8,1170.98 ccw(c192.8,1070.98) 122.09,1141.69 100.88,1120.48 ccw(c171.59,1049.77) 71.59,1049.77 71.59,628.04 cw(c13.55,628.04) 54.59,587 ccw(c95.63,545.96) 37.59,545.96 37.59,210 ccw(c113.95,210) 59.96,156 152.9,63.06 ccw(c223.61,133.77) 223.61,33.77 498.47,33.77 ccw(c498.47,129.71) 566.29,61.84 v9(567.76,63.31)
  Bottom Layer w4: v10(288.98,1170.98) 290.22,1172.22 333.76,1172.22 FRAME.110@335,1173.46
TMR8: FRAME.24 U1.V17 | length 945
  Top Layer w10: U1.V17@803.98,142.05 v3(819.72,126.3)
  Int6 (Sign) w4: v3(819.72,126.3) 831.61,138.18 cw(c878.97,90.81) 835.37,141.66 cw(c878.97,90.81) v8(878.97,157.8)
  Bottom Layer w4: v8(878.97,157.8) 895.78,157.8 ccw(c895.78,242.7) 955.78,182.63 980.68,207.53 cw(c1011.78,176.43) 1011.78,220.41 1030,220.41 ccw(c1030,239.81) 1049.4,239.81 1049.4,798.92 cw(c1113.12,798.92) 1068.06,843.97 cw(c1103.14,808.89) 1103.14,858.5 FRAME.24@1106.44,858.5
TMR9: FRAME.25 U1.V18 | length 919.9
  Top Layer w10: U1.V18@835.47,142.05 836.12,142.05 851.86,126.3 v3(852.51,126.3)
  Bottom Layer w4: v3(852.51,126.3) 857.92,131.71 cw(c878.97,110.67) 878.97,140.43 892.09,140.43 ccw(c892.09,213.49) 896.17,140.55 ccw(c892.09,213.49) 943.75,161.83 ccw(c906.71,213.06) 951.41,168.36 984.19,201.13 cw(c1013.83,171.49) 1013.83,213.41 1031.2,213.41 ccw(c1031.2,238.62) 1056.4,238.62 1056.4,780 cw(c1110.58,780) 1072.25,818.29 1079.28,825.32 cw(c1111.87,792.73) 1111.87,838.82 FRAME.25@1130.28,838.82
TMR10: FRAME.26 U1.U17 | length 860
  Top Layer w10: U1.U17@803.98,173.54 818.83,158.69 v9(820.12,157.53)
  Int4 (Sign) w4: v9(820.12,157.53) 892.53,157.8 ccw(c892.57,244.79) 954.08,183.28 1045.71,274.9 ccw(c975,345.61) 1075,345.61 1075,777.66 1077.16,777.66 v10(1079.5,780)
  Bottom Layer w4: v10(1079.5,780) 1079.62,779.88 1130.16,779.88 FRAME.26@1130.28,779.76
UART0_RX: FRAME.192 U1.V20 | length 2131.2
  Top Layer w10: U1.V20@898.46,142.05 v3(914.21,126.3)
  Bottom Layer w4: 53.85,142.31 cw(c81.68,170.09) 42.36,170.09 42.36,1164.13 cw(c64.89,1164.13) 48.95,1180.05 55.56,1186.66 cw(c71.22,1171) 71.22,1193.15 FRAME.192@94.84,1193.15 ; 53.88,142.28 154.85,41.31 ccw(c171.75,58.21) 171.75,34.31 905.87,34.31 ccw(c905.87,78.4) 925.2,38.77 ccw(c889.64,74.33) 939.93,74.33 939.93,82.4 ccw(c896.03,82.4) 927.07,113.44 v3(914.21,126.3)
UART0_TX: FRAME.193 U1.R17 | length 1894.8
  Top Layer w10: U1.R17@803.98,236.54 v9(819.72,220.79)
  Int4 (Sign) w4: v10(142.74,1210) 482.04,1210 cw(c482.04,1171.88) 505.32,1202.07 cw(c481.93,1178.69) 515,1178.69 515,1164.88 ccw(c569.88,1164.88) 531.07,1126.07 ; 531.1,1126.05 ccw(c569.88,1164.88) 569.88,1110 660.11,1110 cw(c660.11,1021.96) 722.33,1084.25 ; 722.36,1084.21 1014.55,792.03 cw(c1001.7,779.17) 1014.95,791.62 cw(c1001.7,779.17) 1019.87,779.17 1019.87,595.38 cw(c919.87,595.38) 990.58,524.67 911.7,445.78 ccw(c922.95,434.54) 907.05,434.54 907.05,272.57 942.49,237.13 942.49,219.79 933.75,211.05 832.61,211.05 822.88,220.79 v9(819.72,220.79)
  Bottom Layer w4: FRAME.193@94.84,1212.83 96.26,1211.42 141.33,1211.42 v10(142.74,1210)
UART1_RX: FRAME.23 U1.U14 | length 1315.7
  Top Layer w4: v3(725.24,157.8) 775.09,157.8 cw(c775.09,142.88) 790,142.88 v10(790,60.77)
  Top Layer w10: U1.U14@709.49,173.54 v3(725.24,157.8)
  Bottom Layer w4: v10(790,60.77) 794,55 870.66,55 ccw(c870.66,63.31) 878.97,63.31 878.97,96.09 ccw(c866.5,96.09) 866.5,108.57 848.02,108.57 cw(c848.02,120.09) 836.5,120.09 836.5,141.66 cw(c868.95,141.66) 846,164.61 851.22,169.83 cw(c886.64,134.41) 886.64,184.5 933.75,184.5 ccw(c933.75,218.32) 957.66,194.41 977.18,213.93 cw(c1009.77,181.3) 1009.77,227.41 1028.87,227.41 ccw(c1028.87,246.02) 1031.17,227.55 ccw(c1030.33,234.5) 1031.53,227.61 1031.63,227.63 ccw(c1029.32,240.5) 1042.4,240.5 1042.4,810.58 cw(c1110.95,810.58) 1062.48,859.06 cw(c1108.67,812.86) 1108.67,878.19 FRAME.23@1114.43,878.19
  other v14: 790,60.77
UART1_TX: FRAME.22 U1.W18 | length 1120.8
  Top Layer w10: U1.W18@835.47,110.55 835.47,109.93 851.22,94.18 v3(851.22,93.57)
  Bottom Layer w4: 807.77,101.66 ccw(c824.36,118.3) 824.36,94.8 849.98,94.8 v3(851.22,93.57) ; 807.75,101.68 cw(c824.36,118.3) 800.87,118.3 800.87,143.59 cw(c840.87,143.59) 812.59,171.87 820.45,179.73 cw(c848.87,151.31) 848.87,191.5 901.63,191.5 ccw(c901.63,267.05) 955.03,213.61 ; 955.07,213.65 cw(c1005.22,163.46) 1005.22,234.41 1028.87,234.41 ccw(c1028.87,246.02) 1029.32,234.42 ccw(c1028.87,246.02) 1029.38,234.42 ccw(c1028.87,246.02) 1030.33,234.5 ccw(c1029.32,240.5) 1035.4,240.5 1035.4,848.5 cw(c1088.52,848.5) 1050.96,886.06 cw(c1079.48,857.54) 1079.48,897.87 FRAME.22@1130.28,897.87
UART2_RX: FRAME.124 U1.Y3 | length 1182.1
  Top Layer w10: v3(347.28,63.31) U1.Y3@363.03,79.06
  Int6 (Sign) w4: v8(233.42,862.82) 240.07,856.16 240.07,611.72 cw(c140.07,611.72) 234.25,578.1 cw(c140.07,611.72) 217.44,548.36 cw(c140.07,611.72) 210.79,541.01 204.1,534.33 ccw(c234.55,503.87) 194.69,520.19 ccw(c234.55,503.87) 191.48,503.87 191.48,452.64 ccw(c237.64,452.64) 205,420 cw(c156.72,371.72) 225,371.72 225,370 cw(c193.25,370) 215.7,347.55 196.13,327.98 ccw(c222.99,301.12) 185,301.12 185,207.58 cw(c139.2,207.58) 171.59,175.2 162.19,165.8 ccw(c201.69,126.3) 145.83,126.3 145.83,102.25 ccw(c217.72,102.25) 166.88,51.42 ccw(c185.35,69.89) 185.35,43.77 306.21,43.77 ccw(c306.21,95.77) 342.97,59 v3(347.28,63.31)
  Bottom Layer w4: v8(233.42,862.82) 330.68,862.82 FRAME.124@335,858.5
UART2_TX: FRAME.123 U1.Y4 | length 1263.3
  Top Layer w10: v3(378.78,63.31) U1.Y4@394.53,79.06
  Int6 (Sign) w4: v8@206.14,877.91 ccw(c247.13,836.92) 189.16,836.92 189.16,580.56 cw(c157.75,580.56) 185.73,566.29 cw(c157.75,580.56) 179.96,558.35 ccw(c200.17,538.13) 171.59,538.13 171.59,245.69 cw(c71.59,245.69) 142.3,174.98 137.41,170.1 ccw(c175.21,132.3) 121.76,132.3 121.76,106.91 ccw(c200.23,106.91) 144.74,51.42 ccw(c187.35,94.03) 187.35,33.77 347.77,33.77 ccw(c347.77,65.82) 370.41,43.13 ccw(c367.6,45.98) 371.32,44.51 v3(378.78,63.31)
  Bottom Layer w4: v8(206.16,877.93) 208.05,879.82 333.37,879.82 FRAME.123@335,878.19
UART3_RX: FRAME.126 U1.V7 | length 867.4
  Top Layer w10: v3(472.96,126.34) 474.68,127.71 U1.V7@489.02,142.05
  Int6 (Sign) w4: v8@280.86,234.04 ccw(c250.1,264.74) 293.56,264.74 293.56,775.26 v8(291,777.82)
  Bottom Layer w4: v8(280.83,234.01) ccw(c380.43,234.01) 309.99,163.6 315.8,157.78 ccw(c352,194.01) 352,142.8 432.37,142.8 cw(c432.37,86.47) 471.14,127.33 v3(472.96,126.34) ; v8(291,777.82) 291.97,778.79 334.03,778.79 FRAME.126@335,779.76
UART3_TX: FRAME.125 U1.W6 | length 909.8
  Top Layer w10: v7(442.82,94.88) 442.82,95.36 457.52,110.07 U1.W6@457.52,110.55
  Int3 (Sign) w4: v26(276.56,344.86) 276.56,261.59 ccw(c376.56,261.59) 305.85,190.88 324.64,172.08 ccw(c395.35,242.8) 395.35,142.8 413.25,142.8 cw(c413.25,124.15) 426.42,137.35 ; 426.43,137.33 431.89,131.87 cw(c405.52,105.5) 442.82,105.5 v7(442.82,94.88)
  Int6 (Sign) w4: v26(276.56,344.86) cw(c282.73,351.04) 274,351.04 274,793.87 cw(c332.16,793.87) v8(291.04,835)
  Bottom Layer w4: v8(291.04,835) 292.94,836.91 333.09,836.91 FRAME.125@335,838.82
VDD_RTC: FRAME.72 TP10.0 U1.E13 | length 833.7
  Top Layer w4: v19(1075,815) 1096.55,815 1106.87,825.32 1112.76,819.44 1108.36,815.04 cw(c1108.36,812.87) TP10.0@1110.52,812.87
  Top Layer w10: U1.E13@677.99,551.5 678.86,551.5 692.87,565.5 v3(693.74,565.5)
  Int6 (Sign) w4: v3(693.74,565.5) 694.2,565.04 ccw(c764.91,635.75) 706.36,554.68 ccw(c764.91,635.75) 764.91,535.75 816.13,535.75 ccw(c816.13,635.75) 886.84,565.04 917.96,596.16 ccw(c847.24,666.87) 945.7,649.34 ccw(c847.24,666.87) 947.24,666.87 v8(947.24,714.68) 945.59,716.33 ccw(c906.13,716.33) 934.03,744.24 901.43,776.83 ; 901.42,776.85 cw(c927.44,802.83) 890.66,802.83 cw(c920.8,802.83) 896.19,820.22 cw(c920.8,802.83) 899.49,824.15 907.76,832.42 cw(c923.21,816.97) 923.21,838.82 1017.38,838.82 cw(c1017.38,757.5) 1069.13,820.22 cw(c1017.38,757.5) v19@1074.86,815.02 ; v19@1074.88,815 v19(1075,815)
  Bottom Layer w4: FRAME.72@890.12,720.71 892.99,717.84 944.38,717.84 946.49,715.73 v8(947.24,714.68)
pads on no net: D1.2 FRAME.1 FRAME.2 FRAME.3 FRAME.4 FRAME.5 FRAME.6 FRAME.7 FRAME.8 FRAME.9 FRAME.10 FRAME.11 FRAME.12 FRAME.13 FRAME.14 FRAME.15 FRAME.16 FRAME.17 FRAME.18 FRAME.19 FRAME.20 FRAME.21 FRAME.27 FRAME.28 FRAME.29 FRAME.30 FRAME.31 FRAME.32 FRAME.35 FRAME.36 FRAME.37 FRAME.38 FRAME.39 FRAME.40 FRAME.41 FRAME.42 FRAME.43 FRAME.44 FRAME.45 FRAME.46 FRAME.47 FRAME.48 FRAME.49 FRAME.50 FRAME.62 FRAME.63 FRAME.65 FRAME.66 FRAME.74 FRAME.75 FRAME.77 FRAME.78 FRAME.79 FRAME.80 FRAME.81 FRAME.82 FRAME.83 FRAME.84 FRAME.85 FRAME.86 FRAME.95 FRAME.96 FRAME.97 FRAME.98 FRAME.99 FRAME.100 FRAME.101 FRAME.103 FRAME.104 FRAME.105 FRAME.107 FRAME.108 FRAME.109 FRAME.111 FRAME.112 FRAME.113 FRAME.114 FRAME.116 FRAME.122 FRAME.131 FRAME.132 FRAME.133 FRAME.135 FRAME.136 FRAME.137 FRAME.138 FRAME.139 FRAME.140 FRAME.141 FRAME.142 FRAME.143 FRAME.144 FRAME.145 FRAME.146 FRAME.147 FRAME.148 FRAME.149 FRAME.150 FRAME.155 FRAME.156 FRAME.157 FRAME.158 FRAME.159 FRAME.160 FRAME.161 FRAME.162 FRAME.163 FRAME.164 FRAME.165 FRAME.166 FRAME.167 FRAME.168 FRAME.169 FRAME.170 FRAME.171 FRAME.172 FRAME.173 FRAME.174 FRAME.175 FRAME.176 FRAME.177 FRAME.178 FRAME.179 FRAME.180 FRAME.181 FRAME.182 FRAME.185 FRAME.186 FRAME.187 FRAME.188 FRAME.189 FRAME.190 FRAME.191 FRAME.194 FRAME.195 FRAME.196 FRAME.197 FRAME.198 FRAME.199 FRAME.200 FRAME.211 FRAME.212 FRAME.223 FRAME.224 FRAME.h1 FRAME.h2 FRAME.h3 FRAME.h4 U1.A12 U1.B1 U1.B10 U1.B19 U1.C1 U1.C2 U1.C3 U1.C16 U1.C17 U1.C18 U1.D2 U1.D3 U1.D6 U1.D8 U1.D9 U1.D10 U1.D11 U1.D18 U1.E1 U1.E2 U1.E4 U1.E6 U1.F1 U1.F2 U1.F4 U1.F5 U1.G1 U1.G2 U1.G3 U1.G4 U1.H1 U1.H2 U1.H4 U1.J1 U1.J2 U1.J3 U1.J4 U1.K1 U1.K2 U1.K3 U1.K4 U1.K5 U1.L1 U1.L2 U1.L3 U1.L4 U1.L5 U1.L16 U1.M1 U1.M2 U1.M3 U1.M4 U1.M5 U1.M16 U1.M18 U1.N1 U1.N2 U1.N3 U1.N4 U1.N16 U1.N17 U1.N18 U1.N19 U1.P1 U1.P2 U1.P3 U1.P4 U1.P5 U1.P17 U1.P18 U1.P20 U1.R1 U1.R2 U1.R3 U1.R4 U1.R19 U1.T1 U1.T2 U1.T3 U1.T4 U1.T17 U1.T18 U1.T19 U1.T20 U1.U1 U1.U2 U1.U3 U1.U4 U1.U6 U1.U10 U1.U11 U1.U12 U1.U15 U1.U16 U1.U18 U1.U19 U1.U20 U1.V1 U1.V2 U1.V9 U1.V10 U1.V14 U1.V15 U1.V16 U1.V19 U1.W9 U1.W10 U1.W11 U1.W12 U1.W16 U1.W17 U1.W19 U1.W20 U1.Y5 U1.Y6 U1.Y8 U1.Y9 U1.Y11 U1.Y12 U1.Y16 U1.Y17 U1.Y18 U1.Y19 U2.F9 U3.B6 U3.B8 U3.E8 U3.F1 U3.G2 U3.H1 U3.H8

## Polygon pours and split planes (outlines as drawn)
GND on Int2 (GND) (split plane): 1204.9,20.1 20.1,20.1 20.1,1599.9 1204.9,1599.9
+3V3 on Int5 (PWR) (split plane): 1204.9,20.1 20.1,20.1 20.1,1599.9 1204.9,1599.9
+VDD_INT on Int5 (PWR) (split plane): 551.34,521.94 551.53,520.97 552.08,520.14 552.91,519.59 553.89,519.39 706.53,519.39 706.53,387.2 706.73,386.22 707.28,385.4 707.4,385.28 708.22,384.72 709.2,384.53 766.84,384.53 766.84,340.48 747.23,340.48 746.25,340.29 745.42,339.74 740.05,334.36 739.49,333.53 739.3,332.56 739.3,238.16 708.88,207.75 553.27,207.75 524.88,236.14 524.05,236.7 523.07,236.89 424.55,236.89 424.55,542.24 431.26,548.95 551.34,548.95

## Other copper
Top Layer:
  rectangle net GND: 0,1595 1225,1620
  rectangle net GND: 0.59,2.2 25.59,1614.9
  rectangle net GND: 2.32,2.2 1225,25
  rectangle net GND: 1200,5 1222.8,1620
Bottom Layer:
  rectangle net GND: 0.59,-0.1 25.59,1614.9
  rectangle net GND: 0,2.2 1225,25
  rectangle net GND: 1200,5 1222.8,1620
  rectangle net GND: 0,1595 1225,1620
Int5 (PWR) (plane layer: these items are gaps in the copper):
  lines w5: 552.91,551.5 520.51,551.5 430.2,551.5 422,543.3 422,234.34 523.07,234.34 552.22,205.2 709.94,205.2 741.85,237.11 741.85,332.56 747.23,337.94 769.11,337.94 769.39,338.22 769.39,387.08 709.2,387.08 709.08,387.2 709.08,521.48 709.55,521.94 ; 553.89,550.52 553.89,521.94 709.08,521.94

## Silkscreen, mask and mechanical layers (free items; w line width, h text height)
Top Overlay:
  text "Mars Robotics" at 880.39,1566 h25
  text "V1I2" at 1056,1521 h35
  text "2104" at 1056,1471 h35
BORDER:
  the board outline again, w5